# Altium PCB Audio_Meter_V4.5.PcbDoc (part 3 of 5)
Units mil, origin at the board's own origin, x right, y up, seen from the top; angles counter-clockwise.
Board outline 2756.14 x 2519.69 mil, 2 copper layers (Top Layer, Bottom Layer), stack 57.087 mil thick; 109 components, 62 nets, 315 pads, 566 vias.
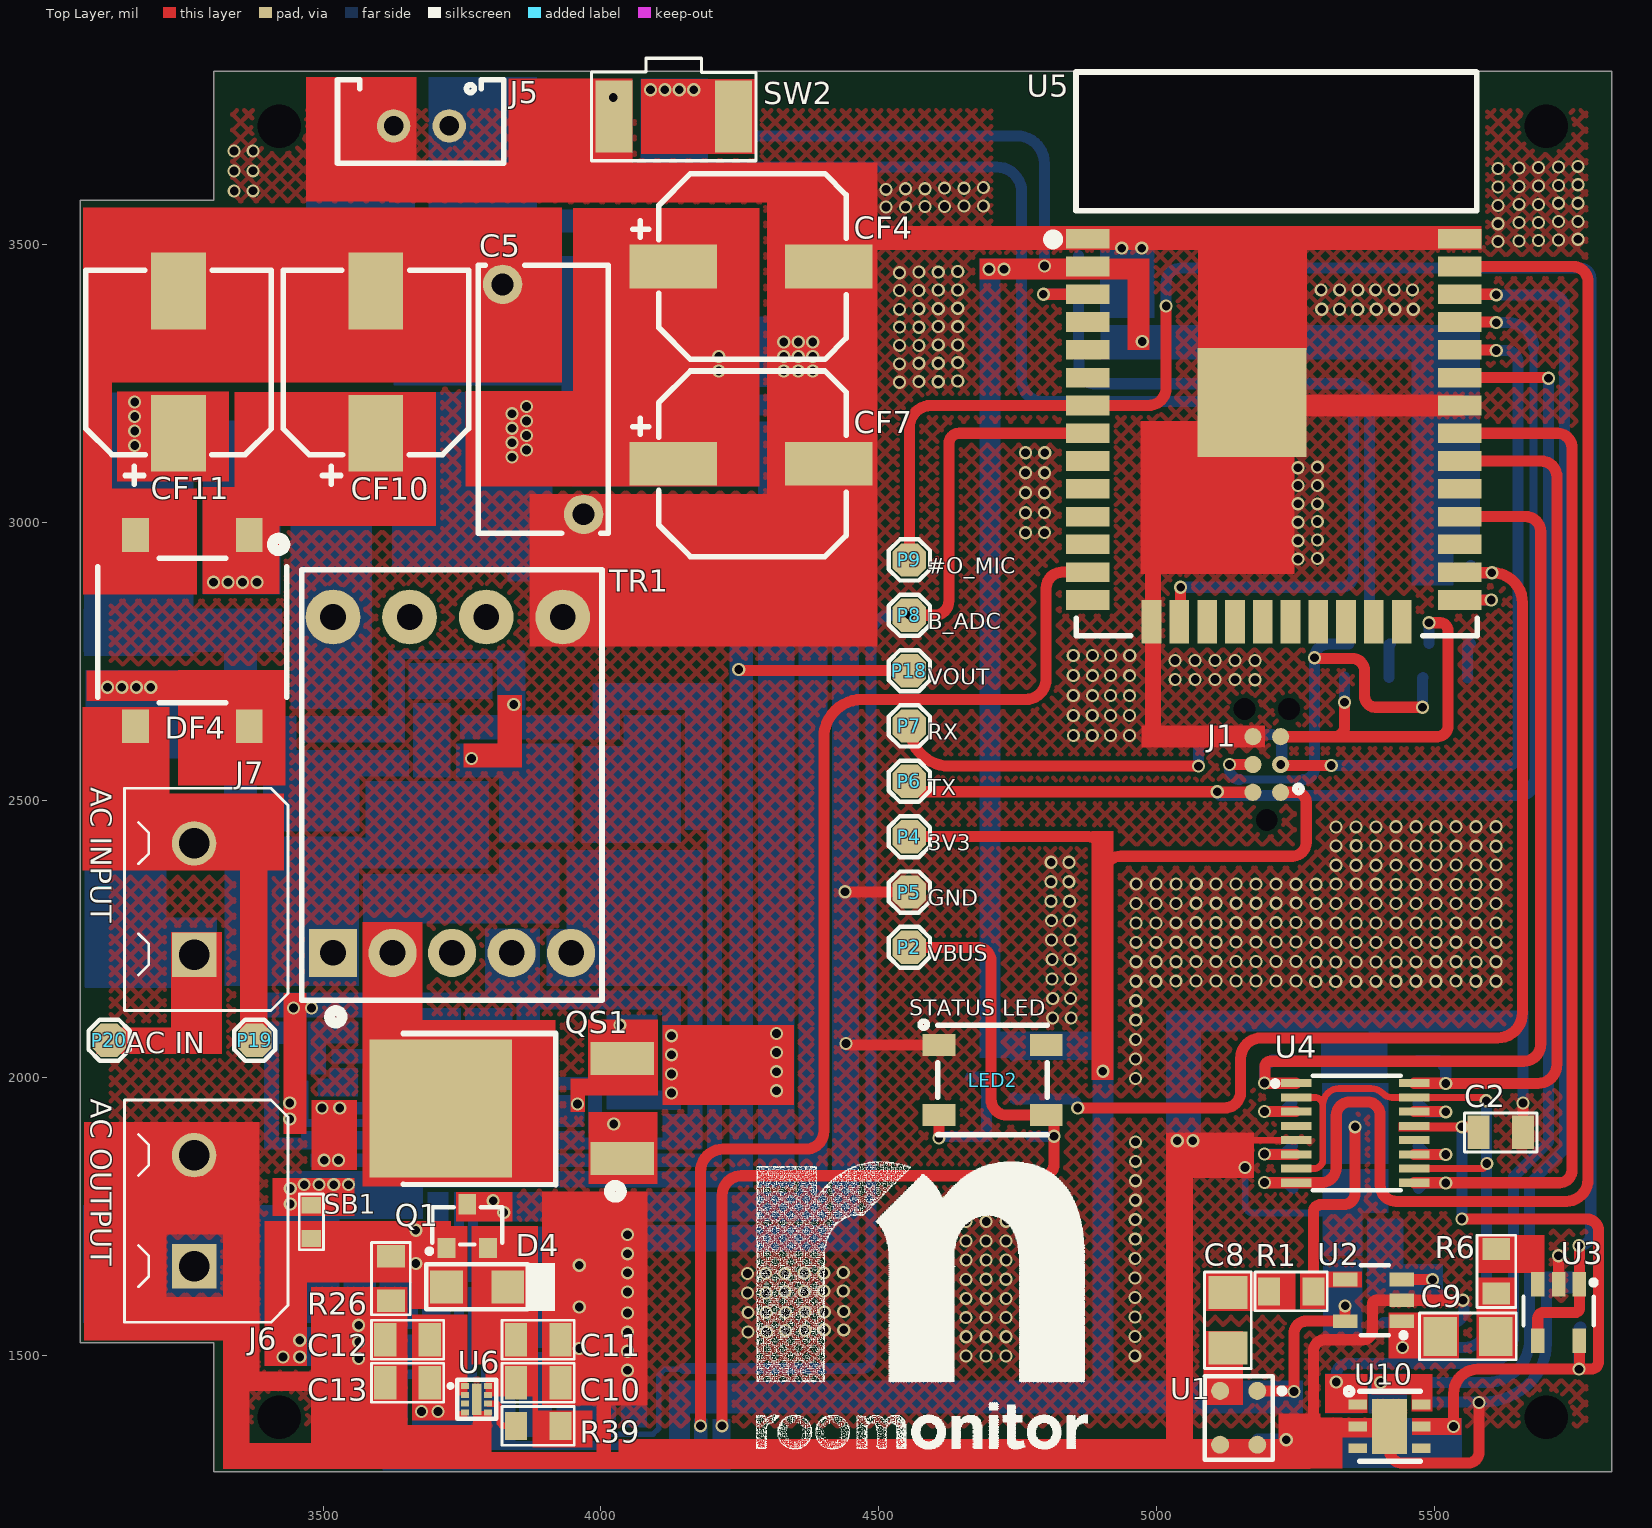
[diagram p0: Top Layer view]

## Part data (continued)
R26: library part ERJ-P06J104V, "RES SMD 100K OHM 5% 1/2W 0805", Case/Package=0805, Case Code (Metric)=2012, MANUFACTURER=Panasonic, Max Operating Temperature=155°C, Max Power Dissipation=250mW, Min Operating Temperature=-55°C, Package Quantity=5000, Power Rating=500mW, Resistance=100kR, Supplier Part Number 1=P100KADCT-ND, Temperature Coefficient=200ppm/°C, Tolerance=5%, Voltage Rating=400V, Voltage Rating (DC)=150V, Case Code (Imperial)=0805, ComponentLink1Description=https://www.verical.com/server-webapp/html/getDatasheet?partID=409513, ComponentLink1URL=https://www.verical.com/server-webapp/html/getDatasheet?partID=409513, ComponentLink2Description=http://components.arrow.com/part/dataview/44988207S7163511N1174, ComponentLink2URL=http://components.arrow.com/part/dataview/44988207S7163511N1174, ComponentLink3Description=https://www.seielect.com/Catalog/SEI-RMCF_RMCP.pdf, ComponentLink3URL=https://www.seielect.com/Catalog/SEI-RMCF_RMCP.pdf, ComponentLink4Description=http://www.seielect.com/catalog/sei-rmc.pdf, ComponentLink4URL=http://www.seielect.com/catalog/sei-rmc.pdf, ComponentLink5Description=https://datasheet.ciiva.com/7777/424479-7777391.pdf, ComponentLink5URL=https://datasheet.ciiva.com/7777/424479-7777391.pdf, ComponentLink6Description=https://datasheet.ciiva.com/2581/crcwhpe3-2581488.pdf, ComponentLink6URL=https://datasheet.ciiva.com/2581/crcwhpe3-2581488.pdf, ComponentLink7Description=https://datasheet.ciiva.com/11808/0900766b80d98b26-11808546.pdf, ComponentLink7URL=https://datasheet.ciiva.com/11808/0900766b80d98b26-11808546.pdf, ComponentLink8Description=https://datasheet.ciiva.com/8934/dcrcwe3-8934585.pdf, ComponentLink8URL=https://datasheet.ciiva.com/8934/dcrcwe3-8934585.pdf, ComponentLink9Description=https://datasheet.ciiva.com/2467/dcrcwe3-2467241.pdf, ComponentLink9URL=https://datasheet.ciiva.com/2467/dcrcwe3-2467241.pdf, ComponentLink10Description=https://datasheet.ciiva.com/7777/1697337-7777401.pdf, ComponentLink10URL=https://datasheet.ciiva.com/7777/1697337-7777401.pdf, ComponentLink11Description=https://datasheet.ciiva.com/16852/dcrcwe3-16852347.pdf, ComponentLink11URL=https://datasheet.ciiva.com/16852/dcrcwe3-16852347.pdf, ComponentLink12Description=https://datasheet.ciiva.com/16200/dcrcwe3-16200123.pdf, ComponentLink12URL=https://datasheet.ciiva.com/16200/dcrcwe3-16200123.pdf, ComponentLink13Description=https://datasheet.ciiva.com/16725/70201119-16725227.pdf, ComponentLink13URL=https://datasheet.ciiva.com/16725/70201119-16725227.pdf, ComponentLink14Description=https://datasheet.ciiva.com/2467/dcrcwe3-2467239.pdf, ComponentLink14URL=https://datasheet.ciiva.com/2467/dcrcwe3-2467239.pdf, ComponentLink15Description=https://datasheet.ciiva.com/7777/1720486-7777575.pdf, ComponentLink15URL=https://datasheet.ciiva.com/7777/1720486-7777575.pdf, ComponentLink16Description=https://datasheet.ciiva.com/8934/dcrcwe3-8934581.pdf, ComponentLink16URL=https://datasheet.ciiva.com/8934/dcrcwe3-8934581.pdf, ComponentLink17Description=https://datasheet.ciiva.com/2467/dcrcwe3-2467240.pdf, ComponentLink17URL=https://datasheet.ciiva.com/2467/dcrcwe3-2467240.pdf, ComponentLink18Description=https://datasheet.ciiva.com/7777/1720486-7777576.pdf, ComponentLink18URL=https://datasheet.ciiva.com/7777/1720486-7777576.pdf, ComponentLink19Description=https://datasheet.ciiva.com/5546/dcrcwe3-109170-5546983.pdf, ComponentLink19URL=https://datasheet.ciiva.com/5546/dcrcwe3-109170-5546983.pdf, ComponentLink20Description=https://datasheet.ciiva.com/16755/70201119-16755757.pdf, ComponentLink20URL=https://datasheet.ciiva.com/16755/70201119-16755757.pdf, ComponentLink21Description=https://datasheet.ciiva.com/3258/dcrcwe3-3258221.pdf, ComponentLink21URL=https://datasheet.ciiva.com/3258/dcrcwe3-3258221.pdf, ComponentLink22Description=https://datasheet.ciiva.com/17204/dcrcwe3-17204398.pdf, ComponentLink22URL=https://datasheet.ciiva.com/17204/dcrcwe3-17204398.pdf, ComponentLink23Description=https://datasheet.ciiva.com/16435/dcrcwe3-16435934.pdf, ComponentLink23URL=https://datasheet.ciiva.com/16435/dcrcwe3-16435934.pdf, ComponentLink24Description=https://datasheet.ciiva.com/46441/1533075-46441628.pdf, ComponentLink24URL=https://datasheet.ciiva.com/46441/1533075-46441628.pdf, ComponentLink25Description=https://datasheet.ciiva.com/5544/dcrcwe3-109170-5544649.pdf, ComponentLink25URL=https://datasheet.ciiva.com/5544/dcrcwe3-109170-5544649.pdf, ComponentLink26Description=https://datasheet.ciiva.com/8337/dcrcwe3-8337669.pdf, ComponentLink26URL=https://datasheet.ciiva.com/8337/dcrcwe3-8337669.pdf, ComponentLink27Description=https://datasheet.ciiva.com/2463/dcrcwe3-2463179.pdf, ComponentLink27URL=https://datasheet.ciiva.com/2463/dcrcwe3-2463179.pdf, ComponentLink28Description=https://datasheet.ciiva.com/2463/dcrcwe3-2463178.pdf, ComponentLink28URL=https://datasheet.ciiva.com/2463/dcrcwe3-2463178.pdf, ComponentLink29Description=https://datasheet.ciiva.com/2474/crcwhpe3-2474640.pdf, ComponentLink29URL=https://datasheet.ciiva.com/2474/crcwhpe3-2474640.pdf, ComponentLink30Description=https://datasheet.ciiva.com/48527/crcwhpe3-48527638.pdf, ComponentLink30URL=https://datasheet.ciiva.com/48527/crcwhpe3-48527638.pdf, ComponentLink31Description=https://datasheet.ciiva.com/5547/crcwhpe3-46056-5547896.pdf, ComponentLink31URL=https://datasheet.ciiva.com/5547/crcwhpe3-46056-5547896.pdf, ComponentLink32Description=https://datasheet.ciiva.com/9112/crcwhpe3-9112140.pdf, ComponentLink32URL=https://datasheet.ciiva.com/9112/crcwhpe3-9112140.pdf, ComponentLink33Description=https://datasheet.ciiva.com/2474/crcwhpe3-2474638.pdf, ComponentLink33URL=https://datasheet.ciiva.com/2474/crcwhpe3-2474638.pdf, ComponentLink34Description=https://datasheet.ciiva.com/2474/crcwhpe3-2474639.pdf, ComponentLink34URL=https://datasheet.ciiva.com/2474/crcwhpe3-2474639.pdf, ComponentLink35Description=http://uk.rs-online.com/webdocs/12cb/0900766b812cb812.pdf?src-supplier=RSComponents, ComponentLink35URL=http://uk.rs-online.com/webdocs/12cb/0900766b812cb812.pdf?src-supplier=RSComponents, ComponentLink36Description=http://industrial.panasonic.com/www-data/pdf/AOA0000/AOA0000CE4.pdf?src-supplier=Avnet, ComponentLink36URL=http://industrial.panasonic.com/www-data/pdf/AOA0000/AOA0000CE4.pdf?src-supplier=Avnet, ComponentLink37Description=http://industrial.panasonic.com/www-data/pdf/AOA0000/AOA0000CE4.pdf?src-supplier=Future+Electronics, ComponentLink37URL=http://industrial.panasonic.com/www-data/pdf/AOA0000/AOA0000CE4.pdf?src-supplier=Future+Electronics, ComponentLink38Description=http://www.farnell.com/datasheets/2059624.pdf?src-supplier=Element14, ComponentLink38URL=http://www.farnell.com/datasheets/2059624.pdf?src-supplier=Element14, ComponentLink39Description=https://www.alliedelec.com/m/d/12e4be79354a6c30aae91f11e8182ea0.pdf?src-supplier=Allied+Electronics, ComponentLink39URL=https://www.alliedelec.com/m/d/12e4be79354a6c30aae91f11e8182ea0.pdf?src-supplier=Allied+Electronics, ComponentLink40Description=http://www.farnell.com/datasheets/2059624.pdf?src-supplier=Farnell, ComponentLink40URL=http://www.farnell.com/datasheets/2059624.pdf?src-supplier=Farnell, ComponentLink41Description=http://industrial.panasonic.com/cdbs/www-data/pdf/RDO0000/AOA0000C331.pdf?src-supplier=Newark, ComponentLink41URL=http://industrial.panasonic.com/cdbs/www-data/pdf/RDO0000/AOA0000C331.pdf?src-supplier=Newark, ComponentLink42Description=https://industrial.panasonic.com/ww/system/files/data/download/catalog/id_fixed-resistors_e_1.pdf?src-supplier=Allied+Electronics, ComponentLink42URL=https://industrial.panasonic.com/ww/system/files/data/download/catalog/id_fixed-resistors_e_1.pdf?src-supplier=Allied+Electronics, ComponentLink43Description=http://industrial.panasonic.com/www-data/pdf/AOA0000/AOA0000CE4.pdf?src-supplier=Avnet+Europe, ComponentLink43URL=http://industrial.panasonic.com/www-data/pdf/AOA0000/AOA0000CE4.pdf?src-supplier=Avnet+Europe, Composition="Thick Film", Contact Plating=Tin, Depth=1.25mm, Height=0.6mm, Lead Free="Lead Free", Length=2mm, Manufacturer Part Number=ERJ-P06J104V, Military Standard=Not, Mount="Surface Mount", Number of Terminations=2, Packaging="Tape and Reel", Pricing 1="1=0.11, 10=0.103, 100=0.0396, 1000=0.0174, 2500=0.0151 (USD)", Radiation Hardening=No, REACH SVHC="No SVHC", Stock 1=131043, Supplier 1=Digi-Key, Termination=SMD/SMT, Width=1.2mm
R28: library part RC0402FR-07665RL, "RES SMD 665 OHM 1% 1/16W 0402", Case/Package=0402, Case Code (Metric)=1005, MANUFACTURER=Yageo, Max Operating Temperature=155°C, Max Power Dissipation=63mW, Min Operating Temperature=-55°C, Power Rating=62.5mW, Resistor Type="Thick Film", Supplier Part Number 1=YAG3208CT-ND, Temperature Coefficient=100ppm/°C, Tolerance=1%, Voltage Rating=50V, Case Code (Imperial)=0402, ComponentLink1Description=http://www.yageo.com/documents/recent/PYu-RC0402_51_RoHS_L_6.pdf?src-supplier=Avnet+Europe, ComponentLink1URL=http://www.yageo.com/documents/recent/PYu-RC0402_51_RoHS_L_6.pdf?src-supplier=Avnet+Europe, Contact Plating=Tin,Matte, Depth=0.5mm, Features="Moisture Resistant", Height=0.016inch, Lead Free="Lead Free", Length=1mm, Manufacturer Part Number=RC0402FR-07665RL, Military Standard=Not, Number of Terminations=2, Packaging="Tape and Reel", Pricing 1="1=0.1, 10=0.015, 100=0.0062, 1000=0.00278, 2500=0.00242, 5000=0.002 (USD)", Resistance=665R, Stock 1=287830, Supplier 1=Digi-Key, Termination=SMD/SMT, Width=0.02inch
R32 R33: library part ERJ-P06J105V, "RES SMD 1M OHM 5% 1/2W 0805", Case/Package=0805, Case Code (Metric)=2012, MANUFACTURER=Panasonic, Max Operating Temperature=155°C, Max Power Dissipation=500mW, Min Operating Temperature=-55°C, Package Quantity=1, Supplier Part Number 1=P1.0MADCT-ND, Temperature Coefficient=200ppm/°C, Tolerance=5%, Voltage Rating=400V, Voltage Rating (DC)=150V, Case Code (Imperial)=0805, ComponentLink1Description=https://www.verical.com/server-webapp/html/getDatasheet?partID=409513, ComponentLink1URL=https://www.verical.com/server-webapp/html/getDatasheet?partID=409513, ComponentLink2Description=http://components.arrow.com/part/dataview/44988207S7163511N1174, ComponentLink2URL=http://components.arrow.com/part/dataview/44988207S7163511N1174, ComponentLink3Description=https://www.seielect.com/Catalog/SEI-RMCF_RMCP.pdf, ComponentLink3URL=https://www.seielect.com/Catalog/SEI-RMCF_RMCP.pdf, ComponentLink4Description=http://www.seielect.com/catalog/sei-rmc.pdf, ComponentLink4URL=http://www.seielect.com/catalog/sei-rmc.pdf, ComponentLink5Description=https://datasheet.ciiva.com/7777/424479-7777391.pdf, ComponentLink5URL=https://datasheet.ciiva.com/7777/424479-7777391.pdf, ComponentLink6Description=https://datasheet.ciiva.com/2581/crcwhpe3-2581488.pdf, ComponentLink6URL=https://datasheet.ciiva.com/2581/crcwhpe3-2581488.pdf, ComponentLink7Description=https://datasheet.ciiva.com/11808/0900766b80d98b26-11808546.pdf, ComponentLink7URL=https://datasheet.ciiva.com/11808/0900766b80d98b26-11808546.pdf, ComponentLink8Description=https://datasheet.ciiva.com/8934/dcrcwe3-8934585.pdf, ComponentLink8URL=https://datasheet.ciiva.com/8934/dcrcwe3-8934585.pdf, ComponentLink9Description=https://datasheet.ciiva.com/2467/dcrcwe3-2467241.pdf, ComponentLink9URL=https://datasheet.ciiva.com/2467/dcrcwe3-2467241.pdf, ComponentLink10Description=https://datasheet.ciiva.com/7777/1697337-7777401.pdf, ComponentLink10URL=https://datasheet.ciiva.com/7777/1697337-7777401.pdf, ComponentLink11Description=https://datasheet.ciiva.com/16852/dcrcwe3-16852347.pdf, ComponentLink11URL=https://datasheet.ciiva.com/16852/dcrcwe3-16852347.pdf, ComponentLink12Description=https://datasheet.ciiva.com/16200/dcrcwe3-16200123.pdf, ComponentLink12URL=https://datasheet.ciiva.com/16200/dcrcwe3-16200123.pdf, ComponentLink13Description=https://datasheet.ciiva.com/16725/70201119-16725227.pdf, ComponentLink13URL=https://datasheet.ciiva.com/16725/70201119-16725227.pdf, ComponentLink14Description=https://datasheet.ciiva.com/2467/dcrcwe3-2467239.pdf, ComponentLink14URL=https://datasheet.ciiva.com/2467/dcrcwe3-2467239.pdf, ComponentLink15Description=https://datasheet.ciiva.com/7777/1720486-7777575.pdf, ComponentLink15URL=https://datasheet.ciiva.com/7777/1720486-7777575.pdf, ComponentLink16Description=https://datasheet.ciiva.com/8934/dcrcwe3-8934581.pdf, ComponentLink16URL=https://datasheet.ciiva.com/8934/dcrcwe3-8934581.pdf, ComponentLink17Description=https://datasheet.ciiva.com/2467/dcrcwe3-2467240.pdf, ComponentLink17URL=https://datasheet.ciiva.com/2467/dcrcwe3-2467240.pdf, ComponentLink18Description=https://datasheet.ciiva.com/7777/1720486-7777576.pdf, ComponentLink18URL=https://datasheet.ciiva.com/7777/1720486-7777576.pdf, ComponentLink19Description=https://datasheet.ciiva.com/5546/dcrcwe3-109170-5546983.pdf, ComponentLink19URL=https://datasheet.ciiva.com/5546/dcrcwe3-109170-5546983.pdf, ComponentLink20Description=https://datasheet.ciiva.com/16755/70201119-16755757.pdf, ComponentLink20URL=https://datasheet.ciiva.com/16755/70201119-16755757.pdf, ComponentLink21Description=https://datasheet.ciiva.com/3258/dcrcwe3-3258221.pdf, ComponentLink21URL=https://datasheet.ciiva.com/3258/dcrcwe3-3258221.pdf, ComponentLink22Description=https://datasheet.ciiva.com/17204/dcrcwe3-17204398.pdf, ComponentLink22URL=https://datasheet.ciiva.com/17204/dcrcwe3-17204398.pdf, ComponentLink23Description=https://datasheet.ciiva.com/16435/dcrcwe3-16435934.pdf, ComponentLink23URL=https://datasheet.ciiva.com/16435/dcrcwe3-16435934.pdf, ComponentLink24Description=https://datasheet.ciiva.com/46441/1533075-46441628.pdf, ComponentLink24URL=https://datasheet.ciiva.com/46441/1533075-46441628.pdf, ComponentLink25Description=https://datasheet.ciiva.com/5544/dcrcwe3-109170-5544649.pdf, ComponentLink25URL=https://datasheet.ciiva.com/5544/dcrcwe3-109170-5544649.pdf, ComponentLink26Description=https://datasheet.ciiva.com/8337/dcrcwe3-8337669.pdf, ComponentLink26URL=https://datasheet.ciiva.com/8337/dcrcwe3-8337669.pdf, ComponentLink27Description=https://datasheet.ciiva.com/2463/dcrcwe3-2463179.pdf, ComponentLink27URL=https://datasheet.ciiva.com/2463/dcrcwe3-2463179.pdf, ComponentLink28Description=https://datasheet.ciiva.com/2463/dcrcwe3-2463178.pdf, ComponentLink28URL=https://datasheet.ciiva.com/2463/dcrcwe3-2463178.pdf, ComponentLink29Description=https://datasheet.ciiva.com/2474/crcwhpe3-2474640.pdf, ComponentLink29URL=https://datasheet.ciiva.com/2474/crcwhpe3-2474640.pdf, ComponentLink30Description=https://datasheet.ciiva.com/48527/crcwhpe3-48527638.pdf, ComponentLink30URL=https://datasheet.ciiva.com/48527/crcwhpe3-48527638.pdf, ComponentLink31Description=https://datasheet.ciiva.com/5547/crcwhpe3-46056-5547896.pdf, ComponentLink31URL=https://datasheet.ciiva.com/5547/crcwhpe3-46056-5547896.pdf, ComponentLink32Description=https://datasheet.ciiva.com/9112/crcwhpe3-9112140.pdf, ComponentLink32URL=https://datasheet.ciiva.com/9112/crcwhpe3-9112140.pdf, ComponentLink33Description=https://datasheet.ciiva.com/2474/crcwhpe3-2474638.pdf, ComponentLink33URL=https://datasheet.ciiva.com/2474/crcwhpe3-2474638.pdf, ComponentLink34Description=https://datasheet.ciiva.com/2474/crcwhpe3-2474639.pdf, ComponentLink34URL=https://datasheet.ciiva.com/2474/crcwhpe3-2474639.pdf, ComponentLink35Description=http://uk.rs-online.com/webdocs/12cb/0900766b812cb812.pdf?src-supplier=RSComponents, ComponentLink35URL=http://uk.rs-online.com/webdocs/12cb/0900766b812cb812.pdf?src-supplier=RSComponents, ComponentLink36Description=http://industrial.panasonic.com/www-data/pdf/AOA0000/AOA0000CE4.pdf?src-supplier=Avnet, ComponentLink36URL=http://industrial.panasonic.com/www-data/pdf/AOA0000/AOA0000CE4.pdf?src-supplier=Avnet, ComponentLink37Description=http://industrial.panasonic.com/www-data/pdf/AOA0000/AOA0000CE4.pdf?src-supplier=Future+Electronics, ComponentLink37URL=http://industrial.panasonic.com/www-data/pdf/AOA0000/AOA0000CE4.pdf?src-supplier=Future+Electronics, ComponentLink38Description=http://www.farnell.com/datasheets/2059624.pdf?src-supplier=Element14, ComponentLink38URL=http://www.farnell.com/datasheets/2059624.pdf?src-supplier=Element14, ComponentLink39Description=https://www.alliedelec.com/m/d/12e4be79354a6c30aae91f11e8182ea0.pdf?src-supplier=Allied+Electronics, ComponentLink39URL=https://www.alliedelec.com/m/d/12e4be79354a6c30aae91f11e8182ea0.pdf?src-supplier=Allied+Electronics, ComponentLink40Description=http://www.farnell.com/datasheets/2059624.pdf?src-supplier=Farnell, ComponentLink40URL=http://www.farnell.com/datasheets/2059624.pdf?src-supplier=Farnell, ComponentLink41Description=http://www.alliedelec.com/m/d/12e4be79354a6c30aae91f11e8182ea0.pdf?src-supplier=Allied+Electronics, ComponentLink41URL=http://www.alliedelec.com/m/d/12e4be79354a6c30aae91f11e8182ea0.pdf?src-supplier=Allied+Electronics, ComponentLink42Description=http://www.mouser.com/ds/2/315/AOA0000CE4-64075.pdf?src-supplier=Mouser, ComponentLink42URL=http://www.mouser.com/ds/2/315/AOA0000CE4-64075.pdf?src-supplier=Mouser, ComponentLink43Description=http://industrial.panasonic.com/www-data/pdf/AOA0000/AOA0000CE4.pdf?src-supplier=Avnet+Europe, ComponentLink43URL=http://industrial.panasonic.com/www-data/pdf/AOA0000/AOA0000CE4.pdf?src-supplier=Avnet+Europe, Composition="Thick Film", Contact Plating=Tin, Depth=1.25mm, Features="Automotive AEC-Q200", Height=0.6mm, Lead Free="Lead Free", Length=2mm, Manufacturer Part Number=ERJ-P06J105V, Military Standard=Not, Mount="Surface Mount", Number of Terminations=2, Packaging="Tape and Reel", Power Rating=500mW, Pricing 1="1=0.11, 10=0.103, 100=0.0396, 1000=0.0174, 2500=0.0151 (USD)", Radiation Hardening=No, REACH SVHC=Unknown, Resistance=1M, Stock 1=57880, Supplier 1=Digi-Key, Termination=SMD/SMT, Width=0.049inch
RC1: library part RC0402JR-0710KL, "RES SMD 10K OHM 5% 1/16W 0402", Case/Package=0402, Case Code (Metric)=1005, MANUFACTURER=Yageo, Max Operating Temperature=155°C, Max Power Dissipation=63mW, Min Operating Temperature=-55°C, Package Quantity=1, Power Rating=62.5mW, Resistance=10kR, Supplier Part Number 1=311-10KJRCT-ND, Temperature Coefficient=100ppm/°C, Tolerance=5%, Voltage Rating=50V, Case Code (Imperial)=0402, ComponentLink1Description=https://www.verical.com/server-webapp/html/getDatasheet?partID=89073&src-supplier=Verical, ComponentLink1URL=https://www.verical.com/server-webapp/html/getDatasheet?partID=89073&src-supplier=Verical, ComponentLink2Description=http://www.yageo.com/documents/recent/PYu-RC_Group_51_RoHS_L_10.pdf?src-supplier=Digi-Key, ComponentLink2URL=http://www.yageo.com/documents/recent/PYu-RC_Group_51_RoHS_L_10.pdf?src-supplier=Digi-Key, ComponentLink3Description=http://www.mouser.com/ds/2/447/PYu-RC0402_51_RoHS_L_6_r-8721.pdf?src-supplier=Mouser, ComponentLink3URL=http://www.mouser.com/ds/2/447/PYu-RC0402_51_RoHS_L_6_r-8721.pdf?src-supplier=Mouser, ComponentLink4Description=http://www.farnell.com/datasheets/2167052.pdf?src-supplier=Element14, ComponentLink4URL=http://www.farnell.com/datasheets/2167052.pdf?src-supplier=Element14, Composition="Thick Film", Depth=0.5mm, Features="Moisture Resistant", Height=0.016inch, Lead Free="Lead Free", Length=1mm, Manufacturer Part Number=RC0402JR-0710KL, Military Standard=Not, Number of Terminations=2, Packaging="Tape and Reel", Pricing 1="1=0.1, 10=0.013, 100=0.0053, 1000=0.0024, 2500=0.0021, 5000=0.0017 (USD)", REACH SVHC=Unknown, Stock 1=6219642, Supplier 1=Digi-Key, Termination=SMD/SMT, Width=0.02inch
RF2 RF6 RF7: library part RK73H2ATTD5114F, "RES 5.11M OHM 1% 1/4W 0805", Case/Package=0805, Case Code (Metric)=2012, MANUFACTURER="KOA Speer", Max Operating Temperature=155°C, Min Operating Temperature=-55°C, Package Quantity=5000, Power Rating=125mW, Resistance=5.11MR, Supplier Part Number 1=2019-RK73H2ATTD5114FCT-ND, Temperature Coefficient=400ppm/°C, Tolerance=1%, Voltage Rating=150V, Case Code (Imperial)=0805, Category="Chip SMD Resistors", ComponentLink1Description=http://components.arrow.com/part/dataview/39731086S7548087N5146?src-supplier=Arrow+Electronics, ComponentLink1URL=http://components.arrow.com/part/dataview/39731086S7548087N5146?src-supplier=Arrow+Electronics, ComponentLink2Description=http://www.koaspeer.com/catimages/Products/RK73H/RK73H.pdf?src-supplier=Mouser, ComponentLink2URL=http://www.koaspeer.com/catimages/Products/RK73H/RK73H.pdf?src-supplier=Mouser, Height=0.5mm, Lead Free="Lead Free", Length=2mm, Manufacturer Part Number=RK73H2ATTD5114F, Packaging="Tape and Reel", Pricing 1="1=0.10000, 10=0.03000, 100=0.01240, 1000=0.00557, 2500=0.00483 (USD)", RoHS=Yes, Stock 1=19860, Supplier 1=Digi-Key, Termination=SMD/SMT, Voltage Rating (DC)=150V, Width=1.25mm
RF8: library part RK73H1ETTP4870F, "RES 487 OHM 1% 1/10W 0402", Case Code (Imperial)=0402, Case Code (Metric)=1005, MANUFACTURER="KOA Speer", Max Operating Temperature=155°C, Min Operating Temperature=-55°C, Package Quantity=10000, Power Rating=63mW, Resistor Type="Thick Film", Supplier Part Number 1=2019-RK73H1ETTP4870FCT-ND, Temperature Coefficient=100ppm/°C, Tolerance=1%, Voltage Rating=50V, Case/Package=0402, Category="Chip SMD Resistors", ComponentLink1Description=https://datasheet.ciiva.com/5554/rk73h-5554092.pdf?src-supplier=Mouser, ComponentLink1URL=https://datasheet.ciiva.com/5554/rk73h-5554092.pdf?src-supplier=Mouser, Depth=0.5mm, Height=0.35mm, Lead Free="Lead Free", Length=1mm, Manufacturer Part Number=RK73H1ETTP4870F, Military Standard=Not, Packaging="Tape and Reel", Pricing 1="1=0.10000, 10=0.02200, 100=0.00890, 1000=0.00398, 2500=0.00345, 5000=0.00285 (USD)", Resistance=487R, RoHS=Yes, Stock 1=19738, Supplier 1=Digi-Key, Termination=SMD/SMT, Voltage Rating (DC)=50V, Width=0.5mm
RF10: library part RK73B1ETTP100J, "RES 10 OHM 5% 1/10W 0402", Case/Package=0402, Case Code (Metric)=1005, MANUFACTURER="KOA Speer", Max Operating Temperature=155°C, Min Operating Temperature=-55°C, Package Quantity=10000, Power Rating=63mW, Resistor Type="Thick Film", Supplier Part Number 1=2019-RK73B1ETTP100JCT-ND, Temperature Coefficient=200ppm/°C, Tolerance=5%, Voltage Rating=50V, Case Code (Imperial)=0402, Category="Chip SMD Resistors", ComponentLink1Description=https://datasheet.ciiva.com/27054/1876725-27054392.pdf?src-supplier=Jameco, ComponentLink1URL=https://datasheet.ciiva.com/27054/1876725-27054392.pdf?src-supplier=Jameco, ComponentLink2Description=https://datasheet.ciiva.com/5554/rk73b-5554335.pdf?src-supplier=Mouser, ComponentLink2URL=https://datasheet.ciiva.com/5554/rk73b-5554335.pdf?src-supplier=Mouser, Depth=0.5mm, Height=0.35mm, Lead Free="Lead Free", Length=1mm, Manufacturer Part Number=RK73B1ETTP100J, Military Standard=Not, Mount="Surface Mount", Packaging="Tape and Reel", Pricing 1="1=0.10000, 10=0.01500, 100=0.00590, 1000=0.00265, 2500=0.00230, 5000=0.00190 (USD)", Resistance=10R, RoHS=Yes, Stock 1=424333, Supplier 1=Digi-Key, Termination=SMD/SMT, Voltage Rating (DC)=50V, Width=0.5mm
RF11 RF17: library part ERJ-2RKF1002X, "RES SMD 10K OHM 1% 1/10W 0402", Case/Package=0402, Case Code (Metric)=1005, MANUFACTURER=Panasonic, Max Operating Temperature=155°C, Max Power Dissipation=100mW, Min Operating Temperature=-55°C, Package Quantity=1, Resistance=10kR, Resistor Type="Thick Film", Supplier Part Number 1=P10.0KLCT-ND, Temperature Coefficient=100ppm/°C, Tolerance=1%, Voltage Rating=50V, Case Code (Imperial)=0402, Category="Chip SMD Resistors", ComponentLink1Description=https://datasheet.ciiva.com/11821/0900766b80f80784-11821171.pdf?src-supplier=RSComponents, ComponentLink1URL=https://datasheet.ciiva.com/11821/0900766b80f80784-11821171.pdf?src-supplier=RSComponents, ComponentLink2Description=https://datasheet.ciiva.com/16199/aoa0000ce2-16199478.pdf?src-supplier=Future+Electronics, ComponentLink2URL=https://datasheet.ciiva.com/16199/aoa0000ce2-16199478.pdf?src-supplier=Future+Electronics, ComponentLink3Description=https://datasheet.ciiva.com/17212/aoa0000ce2-17212102.pdf?src-supplier=Avnet+Europe, ComponentLink3URL=https://datasheet.ciiva.com/17212/aoa0000ce2-17212102.pdf?src-supplier=Avnet+Europe, ComponentLink4Description=https://datasheet.ciiva.com/24023/aoa0000ce2-24023017.pdf?src-supplier=Mouser, ComponentLink4URL=https://datasheet.ciiva.com/24023/aoa0000ce2-24023017.pdf?src-supplier=Mouser, ComponentLink5Description=https://datasheet.ciiva.com/28514/1678782-28514185.pdf?src-supplier=Element14, ComponentLink5URL=https://datasheet.ciiva.com/28514/1678782-28514185.pdf?src-supplier=Element14, ComponentLink6Description=https://datasheet.ciiva.com/43467/1678782-43467402.pdf?src-supplier=Farnell, ComponentLink6URL=https://datasheet.ciiva.com/43467/1678782-43467402.pdf?src-supplier=Farnell, ComponentLink7Description=https://datasheet.ciiva.com/27055/1987020-27055643.pdf?src-supplier=Jameco, ComponentLink7URL=https://datasheet.ciiva.com/27055/1987020-27055643.pdf?src-supplier=Jameco, ComponentLink8Description=https://datasheet.ciiva.com/48531/aoa0000ce2-48531069.pdf?src-supplier=Avnet, ComponentLink8URL=https://datasheet.ciiva.com/48531/aoa0000ce2-48531069.pdf?src-supplier=Avnet, ComponentLink9Description=https://datasheet.ciiva.com/9194/aoa0000ce2-9194142.pdf?src-supplier=Avnet, ComponentLink9URL=https://datasheet.ciiva.com/9194/aoa0000ce2-9194142.pdf?src-supplier=Avnet, ComponentLink10Description=https://datasheet.ciiva.com/16782/70260748-16782590.pdf?src-supplier=Allied+Electronics, ComponentLink10URL=https://datasheet.ciiva.com/16782/70260748-16782590.pdf?src-supplier=Allied+Electronics, ComponentLink11Description=https://datasheet.ciiva.com/16786/70260748-16786734.pdf?src-supplier=Allied+Electronics, ComponentLink11URL=https://datasheet.ciiva.com/16786/70260748-16786734.pdf?src-supplier=Allied+Electronics, ComponentLink12Description=https://datasheet.ciiva.com/30201/aoa0000ce2-30201022.pdf?src-supplier=Onlinecomponents.com, ComponentLink12URL=https://datasheet.ciiva.com/30201/aoa0000ce2-30201022.pdf?src-supplier=Onlinecomponents.com, Contact Plating=Tin, Depth=0.5mm, Features="Automotive AEC-Q200", Height=0.35mm, Lead Free="Lead Free", Length=1mm, Manufacturer Part Number=ERJ-2RKF1002X, Military Standard=Not, Mount="Surface Mount", Number of Pins=2, Number of Terminations=2, Packaging="Tape and Reel", Power Rating=100mW, Pricing 1="1=0.10000, 10=0.02200, 100=0.00890, 1000=0.00398, 2500=0.00345, 5000=0.00285 (USD)", Radiation Hardening=No, REACH SVHC="No SVHC", RoHS=Yes, Stock 1=15656546, Supplier 1=Digi-Key, Termination=SMD/SMT, Voltage Rating (DC)=50V, Width=0.02inch
RF12: library part 352210RJT, "RES SMD 10 OHM 5% 3W 2512", Case/Package=2512, Case Code (Metric)=6432, MANUFACTURER="TE Connectivity CGS", Manufacturer Part Number=1-2176230-4, Max Operating Temperature=105°C, Min Operating Temperature=-55°C, Number of Resistors=1, Power Rating=3W, Resistor Type="Thick Film,Power resistor", Supplier Part Number 1=A121124CT-ND, Temperature Coefficient=200ppm/°C, Tolerance=5%, Voltage Rating=250V, Case Code (Imperial)=2512, Category="Chip SMD Resistors", ComponentLink1Description=http://uk.rs-online.com/webdocs/142d/0900766b8142d0f1.pdf?src-supplier=RSComponents, ComponentLink1URL=http://uk.rs-online.com/webdocs/142d/0900766b8142d0f1.pdf?src-supplier=RSComponents, ComponentLink2Description=http://www.farnell.com/datasheets/2007092.pdf?src-supplier=Farnell, ComponentLink2URL=http://www.farnell.com/datasheets/2007092.pdf?src-supplier=Farnell, ComponentLink3Description=http://www.farnell.com/datasheets/2007092.pdf?src-supplier=Element14, ComponentLink3URL=http://www.farnell.com/datasheets/2007092.pdf?src-supplier=Element14, ComponentLink4Description=https://www.te.com/commerce/DocumentDelivery/DDEController?Action=srchrtrv&DocNm=9-1773463-7&DocType=DS&DocLang=English&src-supplier=Digi-Key, ComponentLink4URL=https://www.te.com/commerce/DocumentDelivery/DDEController?Action=srchrtrv&DocNm=9-1773463-7&DocType=DS&DocLang=English&src-supplier=Digi-Key, ComponentLink5Description=http://www.te.com/commerce/DocumentDelivery/DDEController?Action=srchrtrv&DocNm=9-1773463-7&DocType=DS&DocLang=English&src-supplier=Digi-Key, ComponentLink5URL=http://www.te.com/commerce/DocumentDelivery/DDEController?Action=srchrtrv&DocNm=9-1773463-7&DocType=DS&DocLang=English&src-supplier=Digi-Key, ComponentLink6Description=http://www.farnell.com/datasheets/2007092.pdf?src-supplier=Newark, ComponentLink6URL=http://www.farnell.com/datasheets/2007092.pdf?src-supplier=Newark, Depth=3.2mm, Height=1.1mm, Length=6.35mm, Mount="Surface Mount", Number of Terminations=2, Packaging="Tape and Reel", Pricing 1="1=0.56000, 10=0.46900, 100=0.31470, 1000=0.18411 (USD)", REACH SVHC=Unknown, Resistance=10R, RoHS=No, Stock 1=8393, Supplier 1=Digi-Key, Termination=Solder, Voltage Rating (DC)=250V
RF13: library part ERJ-1GNF4641C, "RES SMD 4.64K OHM 1% 1/20W 0201", Case/Package=0201, Case Code (Metric)=0603, MANUFACTURER=Panasonic, Manufacturer Part Number=ERJ-1GEF4641C, Max Operating Temperature=125°C, Max Power Dissipation=50mW, Min Operating Temperature=-55°C, Package Quantity=1, Resistance=4.64kR, Resistor Type="Thick Film", Supplier Part Number 1=667-ERJ-1GEF4641C, Temperature Coefficient=200ppm/°C, Tolerance=1%, Voltage Rating=25V, Voltage Rating (DC)=15V, Case Code (Imperial)=0201, Category="Chip SMD Resistors", ComponentLink1Description=https://datasheet.ciiva.com/2440/erj-g-r-e-rev08-2440120.pdf?src-supplier=Digi-Key, ComponentLink1URL=https://datasheet.ciiva.com/2440/erj-g-r-e-rev08-2440120.pdf?src-supplier=Digi-Key, ComponentLink2Description=https://datasheet.ciiva.com/2440/erj-g-r-e-rev08-2440121.pdf?src-supplier=Digi-Key, ComponentLink2URL=https://datasheet.ciiva.com/2440/erj-g-r-e-rev08-2440121.pdf?src-supplier=Digi-Key, ComponentLink3Description=https://datasheet.ciiva.com/2440/erj-g-r-e-rev08-2440122.pdf?src-supplier=Digi-Key, ComponentLink3URL=https://datasheet.ciiva.com/2440/erj-g-r-e-rev08-2440122.pdf?src-supplier=Digi-Key, ComponentLink4Description=https://datasheet.ciiva.com/30176/aoa0000ce2-30176906.pdf?src-supplier=Onlinecomponents.com, ComponentLink4URL=https://datasheet.ciiva.com/30176/aoa0000ce2-30176906.pdf?src-supplier=Onlinecomponents.com, Contact Plating=Tin, Height=0.01inch, Lead Free="Lead Free", Length=0.024inch, Mount="Surface Mount", Number of Terminations=2, Packaging="Tape and Reel", Power Rating=50mW, Pricing 1="1=0.17000, 50=0.02600, 100=0.01500, 500=0.01200, 1000=0.00900, 5000=0.00700 (USD)", RoHS=Yes, Stock 1=40860, Supplier 1=Mouser, Width=0.3mm
RF14: library part RK73H1ETTP2R05F, "Res 2.05 Ohm 1% 1/10W 0402", Case/Package=0402, MANUFACTURER="KOA Speer", Power Rating=62.5mW, Supplier Part Number 1=2019-RK73H1ETTP2R05FCT-ND, Temperature Coefficient=100ppm/°C, Voltage Rating (DC)=50V, Category="Chip SMD Resistors", Length=1mm, Manufacturer Part Number=RK73H1ETTP2R05F, Pricing 1="1000=0.00421 (USD)", Resistance=2.05R, RoHS=No, Supplier 1=Digi-Key, Width=500um
RF15: library part ERJ-2RKF1213X, "RES SMD 121K OHM 1% 1/10W 0402", Case/Package=0402, Case Code (Metric)=1005, MANUFACTURER=Panasonic, Max Operating Temperature=155°C, Max Power Dissipation=100mW, Min Operating Temperature=-55°C, Package Quantity=1, Resistance=121kR, Resistor Type="Thick Film", Supplier Part Number 1=P121KLCT-ND, Temperature Coefficient=100ppm/°C, Tolerance=1%, Voltage Rating=50V, Case Code (Imperial)=0402, Category="Chip SMD Resistors", ComponentLink1Description=https://datasheet.ciiva.com/30175/aoa0000ce2-30175510.pdf?src-supplier=Onlinecomponents.com, ComponentLink1URL=https://datasheet.ciiva.com/30175/aoa0000ce2-30175510.pdf?src-supplier=Onlinecomponents.com, ComponentLink2Description=https://datasheet.ciiva.com/28531/1678782-28531400.pdf?src-supplier=Element14, ComponentLink2URL=https://datasheet.ciiva.com/28531/1678782-28531400.pdf?src-supplier=Element14, ComponentLink3Description=https://datasheet.ciiva.com/9186/aoa0000ce2-9186073.pdf?src-supplier=Avnet, ComponentLink3URL=https://datasheet.ciiva.com/9186/aoa0000ce2-9186073.pdf?src-supplier=Avnet, ComponentLink4Description=https://datasheet.ciiva.com/46441/426256-46441257.pdf?src-supplier=Element14, ComponentLink4URL=https://datasheet.ciiva.com/46441/426256-46441257.pdf?src-supplier=Element14, ComponentLink5Description=https://datasheet.ciiva.com/28683/1678782-28683147.pdf?src-supplier=Element14, ComponentLink5URL=https://datasheet.ciiva.com/28683/1678782-28683147.pdf?src-supplier=Element14, ComponentLink6Description=https://datasheet.ciiva.com/24069/aoa0000ce2-24069100.pdf?src-supplier=Mouser, ComponentLink6URL=https://datasheet.ciiva.com/24069/aoa0000ce2-24069100.pdf?src-supplier=Mouser, Contact Plating=Tin, Depth=0.5mm, Features="Automotive AEC-Q200", Height=0.016inch, Lead Free="Lead Free", Length=1mm, Manufacturer Part Number=ERJ-2RKF1213X, Military Standard=Not, Mount="Surface Mount", Number of Terminations=2, Packaging="Tape and Reel", Power Rating=100mW, Pricing 1="1=0.10000, 10=0.02200, 100=0.00890, 1000=0.00398, 2500=0.00345, 5000=0.00285 (USD)", REACH SVHC="No SVHC", RoHS=Yes, Stock 1=23579, Supplier 1=Digi-Key, Termination=SMD/SMT, Voltage Rating (DC)=50V, Width=0.02inch
RF16: library part RK73H1ETTP3012F, "RES 30.1K OHM 1% 1/10W 0402", Case/Package=0402, Case Code (Metric)=1005, MANUFACTURER="KOA Speer", Max Operating Temperature=155°C, Min Operating Temperature=-55°C, Package Quantity=10000, Power Rating=63mW, Resistance=30.1kR, Resistor Type="Thick Film", Supplier Part Number 1=2019-RK73H1ETTP3012FCT-ND, Temperature Coefficient=100ppm/°C, Tolerance=1%, Voltage Rating=50V, Case Code (Imperial)=0402, Category="Chip SMD Resistors", ComponentLink1Description=http://components.arrow.com/part/dataview/39721483S6492630N5146?src-supplier=Arrow+Electronics, ComponentLink1URL=http://components.arrow.com/part/dataview/39721483S6492630N5146?src-supplier=Arrow+Electronics, ComponentLink2Description=http://www.jameco.com/Jameco/Products/ProdDS/1883343.pdf?src-supplier=Jameco, ComponentLink2URL=http://www.jameco.com/Jameco/Products/ProdDS/1883343.pdf?src-supplier=Jameco, ComponentLink3Description=https://www.verical.com/server-webapp/html/getDatasheet?partID=170797&src-supplier=Verical, ComponentLink3URL=https://www.verical.com/server-webapp/html/getDatasheet?partID=170797&src-supplier=Verical, ComponentLink4Description=http://www.koaspeer.com/catimages/Products/RK73H/RK73H.pdf?src-supplier=Mouser, ComponentLink4URL=http://www.koaspeer.com/catimages/Products/RK73H/RK73H.pdf?src-supplier=Mouser, Depth=0.5mm, Height=0.35mm, Lead Free="Lead Free", Length=1mm, Manufacturer Part Number=RK73H1ETTP3012F, Military Standard=Not, Mount="Surface Mount", Packaging="Tape and Reel", Pricing 1="1=0.10000, 10=0.02200, 100=0.00890, 1000=0.00398, 2500=0.00345, 5000=0.00285 (USD)", RoHS=Yes, Stock 1=324728, Supplier 1=Digi-Key, Termination=SMD/SMT, Voltage Rating (DC)=50V, Width=0.5mm
RF18: library part ERJ-2RKF22R6X, "RES SMD 22.6 OHM 1% 1/10W 0402", Case/Package=0402, Case Code (Metric)=1005, MANUFACTURER=Panasonic, Max Operating Temperature=155°C, Max Power Dissipation=100mW, Min Operating Temperature=-55°C, Package Quantity=1, Resistor Type="Thick Film", Supplier Part Number 1=P22.6LCT-ND, Temperature Coefficient=100ppm/°C, Tolerance=1%, Voltage Rating=50V, Case Code (Imperial)=0402, Category="Chip SMD Resistors", ComponentLink1Description=https://datasheet.ciiva.com/43467/1678782-43467159.pdf?src-supplier=Farnell, ComponentLink1URL=https://datasheet.ciiva.com/43467/1678782-43467159.pdf?src-supplier=Farnell, ComponentLink2Description=https://datasheet.ciiva.com/22682/1678782-22682056.pdf?src-supplier=Element14, ComponentLink2URL=https://datasheet.ciiva.com/22682/1678782-22682056.pdf?src-supplier=Element14, ComponentLink3Description=https://datasheet.ciiva.com/30072/aoa0000ce2-30072009.pdf?src-supplier=Onlinecomponents.com, ComponentLink3URL=https://datasheet.ciiva.com/30072/aoa0000ce2-30072009.pdf?src-supplier=Onlinecomponents.com, ComponentLink4Description=https://datasheet.ciiva.com/24026/aoa0000ce2-24026219.pdf?src-supplier=Mouser, ComponentLink4URL=https://datasheet.ciiva.com/24026/aoa0000ce2-24026219.pdf?src-supplier=Mouser, ComponentLink5Description=https://datasheet.ciiva.com/22759/1678782-22759662.pdf?src-supplier=Farnell, ComponentLink5URL=https://datasheet.ciiva.com/22759/1678782-22759662.pdf?src-supplier=Farnell, ComponentLink6Description=https://datasheet.ciiva.com/46373/1678782-46373743.pdf?src-supplier=Element14, ComponentLink6URL=https://datasheet.ciiva.com/46373/1678782-46373743.pdf?src-supplier=Element14, Contact Plating=Tin, Depth=0.5mm, Features="Automotive AEC-Q200", Height=0.016inch, Length=1mm, Manufacturer Part Number=ERJ-2RKF22R6X, Military Standard=Not, Mount="Surface Mount", Number of Terminations=2, Packaging="Tape and Reel", Power Rating=100mW, Pricing 1="1=0.10000, 10=0.02200, 100=0.00890, 1000=0.00398, 2500=0.00345, 5000=0.00285 (USD)", Radiation Hardening=No, REACH SVHC="No SVHC", Resistance=22.6R, RoHS=Yes, Stock 1=139011, Supplier 1=Digi-Key, Termination=SMD/SMT, Voltage Rating (DC)=50V, Width=0.02inch
RF19: library part AC0201FR-073K01L, "RES SMD 3.01K OHM 1% 1/20W 0201", Case/Package=0201, MANUFACTURER=Yageo, Max Operating Temperature=155°C, Max Power Dissipation=50mW, Min Operating Temperature=-55°C, Resistance=3.01kR, Resistor Type="Thick Film", Supplier Part Number 1=YAG5205CT-ND, Temperature Coefficient=200ppm/°C, Tolerance=1%, Category="Chip SMD Resistors", ComponentLink1Description=http://www.yageo.com/NewPortal/yageodocoutput?fileName=/pdf/R-Chip/PYu-AC_51_RoHS_L_6.pdf&src-supplier=Digi-Key, ComponentLink1URL=http://www.yageo.com/NewPortal/yageodocoutput?fileName=/pdf/R-Chip/PYu-AC_51_RoHS_L_6.pdf&src-supplier=Digi-Key, ComponentLink2Description=http://www.yageo.com/NewPortal/yageodocoutput?fileName=/pdf/R-Chip/PYu-AC_51_RoHS_L_5.pdf&src-supplier=Digi-Key, ComponentLink2URL=http://www.yageo.com/NewPortal/yageodocoutput?fileName=/pdf/R-Chip/PYu-AC_51_RoHS_L_5.pdf&src-supplier=Digi-Key, Features="Moisture Resistant,Automotive AEC-Q200", Height=0.01inch, Length=0.024inch, Manufacturer Part Number=AC0201FR-073K01L, Number of Terminations=2, Packaging="Tape and Reel", Pricing 1="1=0.10000, 10=0.05800, 100=0.02350, 1000=0.01055, 2500=0.00916, 5000=0.00756 (USD)", RoHS=Yes, Stock 1=39278, Supplier 1=Digi-Key, Width=0.012inch
SB1 SBxx: "Solder Bridge ON"
SW2: library part KSS221GLFS, "Tactile Switch SPST-NO Side Actuated Surface Mount, Right Angle", Contact Current Rating=50mA, Contact Resistance=100mR, Insulation Resistance=1GR, IP Rating=IP40, MANUFACTURER="ITT C&K", Max Operating Temperature=85°C, Max Voltage Rating (DC)=32V, Min Operating Temperature=-40°C, Operating Force=2N, Package Quantity=1, Power Rating=1W, Supplier Part Number 1=401-1097-6-ND, Actuator Length=0.8mm, ComponentLink1Description=https://datasheet.ciiva.com/26917/getdatasheetpartid-773364-26917575.pdf, ComponentLink1URL=https://datasheet.ciiva.com/26917/getdatasheetpartid-773364-26917575.pdf, ComponentLink2Description=https://datasheet.ciiva.com/30466/0900766b8129cd37-30466697.pdf, ComponentLink2URL=https://datasheet.ciiva.com/30466/0900766b8129cd37-30466697.pdf, ComponentLink3Description=https://datasheet.ciiva.com/16496/kss221g20lfs-16496166.pdf, ComponentLink3URL=https://datasheet.ciiva.com/16496/kss221g20lfs-16496166.pdf, ComponentLink4Description=https://datasheet.ciiva.com/18145/getdatasheetpartid-313005-18145235.pdf, ComponentLink4URL=https://datasheet.ciiva.com/18145/getdatasheetpartid-313005-18145235.pdf, ComponentLink5Description=https://datasheet.ciiva.com/16155/kss221glfs-ckcomponents-16155741.pdf, ComponentLink5URL=https://datasheet.ciiva.com/16155/kss221glfs-ckcomponents-16155741.pdf, ComponentLink6Description=https://datasheet.ciiva.com/5684/19445-5684460.pdf, ComponentLink6URL=https://datasheet.ciiva.com/5684/19445-5684460.pdf, ComponentLink7Description=https://datasheet.ciiva.com/2900/kss-2900345.pdf, ComponentLink7URL=https://datasheet.ciiva.com/2900/kss-2900345.pdf, ComponentLink8Description=https://datasheet.ciiva.com/2900/kss-2900343.pdf, ComponentLink8URL=https://datasheet.ciiva.com/2900/kss-2900343.pdf, ComponentLink9Description=https://datasheet.ciiva.com/7986/19445-7986997.pdf, ComponentLink9URL=https://datasheet.ciiva.com/7986/19445-7986997.pdf, ComponentLink10Description=https://datasheet.ciiva.com/2900/kss-2900344.pdf, ComponentLink10URL=https://datasheet.ciiva.com/2900/kss-2900344.pdf, Contact Material=Silver, Contact Plating=Silver, Current Rating=50mA, Depth=4.4mm, Illumination Type=Non-Illuminated,Illuminated, Lead Free="Lead Free", Length=4.5mm, Manufacturer Part Number=KSS221GLFS, Max Current Rating=50mA, Mechanical Life=100000Cycles, Mount="Surface Mount", Orientation="Right Angle", Packaging="Tape and Reel", Pricing 1="1=0.68, 10=0.655, 25=0.6424, 50=0.6182, 100=0.5334, 250=0.4849, 500=0.4607, 1000=0.3637 (USD)", Radiation Hardening=No, REACH SVHC="No SVHC", Stock 1=17242, Supplier 1=Digi-Key, Switch Function=Off-Mom, Switch Travel=0.3mm, Termination="Gull Wing", Throw Configuration=SPST, Voltage Rating (DC)=32V, Width=7mm
TR1: "FLYBACK XFRM WE-FB T-WIN", Current Rating=440mA, DC Resistance (DCR)=2.15R, Frequency=130kHz, Inductance=925uH, MANUFACTURER="Wurth Electronics Midcom", Max Operating Temperature=125°C, Min Operating Temperature=-40°C, Package Quantity=130, Supplier Part Number 1=1297-1022-ND, Category=Transformers, ComponentLink1Description=https://datasheet.ciiva.com/18573/750312723-18573722.pdf?src-supplier=Digi-Key, ComponentLink1URL=https://datasheet.ciiva.com/18573/750312723-18573722.pdf?src-supplier=Digi-Key, Height=10.2mm, Height - Seated (Max)=10.41mm, Length=20.45mm, Manufacturer Part Number=750312723, Mount="Through Hole", Packaging=Tray, Pricing 1="1=5.18000, 10=5.11100, 50=4.79100, 100=4.31200, 500=3.83300 (USD)", RoHS=Yes, Shielding=Shielded, Stock 1=109, Supplier 1=Digi-Key, Termination="Through Hole", Width=19.7mm
U1: "SPU-TOP MIC IOT FOCUSED MIC", MANUFACTURER=Knowles, Operating Supply Current=250uA, Operating Supply Voltage=3.6V, Package Quantity=1200, Supplier Part Number 1=423-1138-1-ND, ComponentLink1Description=https://media.digikey.com/pdf/Data%20Sheets/Knowles%20Acoustics%20PDFs/SiSonic_Design_Guide.pdf?src-supplier=Mouser, ComponentLink1URL=https://media.digikey.com/pdf/Data%20Sheets/Knowles%20Acoustics%20PDFs/SiSonic_Design_Guide.pdf?src-supplier=Mouser, ComponentLink2Description=https://media.digikey.com/pdf/Data%20Sheets/Knowles%20Acoustics%20PDFs/SiSonic_Design_Guide.pdf?src-supplier=Digi-Key, ComponentLink2URL=https://media.digikey.com/pdf/Data%20Sheets/Knowles%20Acoustics%20PDFs/SiSonic_Design_Guide.pdf?src-supplier=Digi-Key, Depth=1.2mm, Direction=Omnidirectional, Height=1.2mm, Impedance=300R, Length=3.76mm, Manufacturer Part Number=SPU0410HR5H-PB, Output Type=Analog, Packaging="Tape and Reel", Pricing 1="1=0.82, 10=0.688, 25=0.6376, 50=0.6006, 100=0.5649, 500=0.48696 (USD)", Shape=Rectangular, Signal to Noise Ratio (SNR)=59dB, Stock 1=83682, Supplier 1=Digi-Key, Termination=SMD/SMT, Voltage Rating=3.6V, Width=2.95mm
U2 U3: "IC OPAMP GP 1 CIRCUIT SOT23-5", Case/Package=SOT-23, Input Bias Current=10pA, Input Offset Voltage (Vos)=1mV, MANUFACTURER="Texas Instruments", Max Operating Temperature=85°C, Max Supply Voltage=5.5V, Min Operating Temperature=-40°C, Min Supply Voltage=2.7V, Nominal Supply Current=250uA, Output Current per Channel=15mA, Package Quantity=250, Power Supply Rejection Ratio (PSRR)=90.46dB, Quiescent Current=250mA, Supplier Part Number 1=OPA344NACT-ND, Voltage Gain=122dB, Bandwidth=1MHz, Common Mode Rejection Ratio=76dB, ComponentLink1Description=http://www.ti.com/general/docs/lit/getliterature.tsp?genericPartNumber=OPA344&fileType=pdf&src-supplier=Newark, ComponentLink1URL=http://www.ti.com/general/docs/lit/getliterature.tsp?genericPartNumber=OPA344&fileType=pdf&src-supplier=Newark, ComponentLink2Description=http://www.farnell.com/datasheets/1882856.pdf?src-supplier=Element14, ComponentLink2URL=http://www.farnell.com/datasheets/1882856.pdf?src-supplier=Element14, ComponentLink3Description=http://www.ti.com/lit/ds/symlink/opa344.pdf?src-supplier=Digi-Key, ComponentLink3URL=http://www.ti.com/lit/ds/symlink/opa344.pdf?src-supplier=Digi-Key, ComponentLink4Description=http://focus.ti.com/lit/ds/symlink/opa344.pdf?src-supplier=Avnet+Europe, ComponentLink4URL=http://focus.ti.com/lit/ds/symlink/opa344.pdf?src-supplier=Avnet+Europe, ComponentLink5Description=http://www.ti.com/general/docs/lit/getliterature.tsp?genericPartNumber=OPA4345&&fileType=pdf&src-supplier=Avnet, ComponentLink5URL=http://www.ti.com/general/docs/lit/getliterature.tsp?genericPartNumber=OPA4345&&fileType=pdf&src-supplier=Avnet, Gain Bandwidth Product=1MHz, Height=1.15mm, Lead Free="Lead Free", Length=2.9mm, Manufacturer Part Number=OPA344NA/250, Max I/O Voltage=1mV, Number of Amplifiers=1, Number of Channels=1, Number of Circuits=1, Number of Elements=1, Number of Pins=5, Packaging="Tape and Reel", Pricing 1="1=1.59, 10=1.43, 25=1.3492, 100=1.0794 (USD)", Radiation Hardening=No, REACH SVHC="No SVHC", Slew Rate=0.8V/µs, Stock 1=6132, Supplier 1=Digi-Key, Unity Gain Bandwidth Product=1MHz, Width=1.6mm
U4: "IC SWITCH QUAD SPST 16TSSOP", Case/Package=TSSOP, High Level Output Current=30mA, MANUFACTURER="Analog Devices", Max Operating Temperature=85°C, Max Power Dissipation=5uW, Max Supply Current=1uA, Max Supply Voltage=5.5V, Min Operating Temperature=-40°C, Min Supply Voltage=1.8V, On-State Resistance=4R, Operating Supply Current=1nA, Package Quantity=1, Power Dissipation=430mW, Supplier Part Number 1=ADG712BRUZ-REELCT-ND, -3db Bandwidth=200MHz, Bandwidth=200MHz, ComponentLink1Description=http://www.analog.com/media/en/technical-documentation/data-sheets/ADG711_712_713.pdf?src-supplier=Digi-Key, ComponentLink1URL=http://www.analog.com/media/en/technical-documentation/data-sheets/ADG711_712_713.pdf?src-supplier=Digi-Key, ComponentLink2Description=http://datasheet.iiic.cc/analog_devices/ADG712BRUZ-REEL.pdf?src-supplier=IIIC, ComponentLink2URL=http://datasheet.iiic.cc/analog_devices/ADG712BRUZ-REEL.pdf?src-supplier=IIIC, Contact Plating=Tin,Matte, Interface=Parallel, Lead Free="Contains Lead", Manufacturer Part Number=ADG712BRUZ-REEL, Mount="Surface Mount", Number of Bits=4, Number of Channels=4, Number of Circuits=4, Number of Inputs=4, Number of Outputs=4, Number of Pins=16, Packaging="Tape and Reel", Polarity=Non-Inverting, Pricing 1="1=2.89, 10=2.598, 25=2.4564, 100=2.129, 250=2.01984, 500=1.81238, 1000=1.52852 (USD)", Stock 1=4085, Supplier 1=Digi-Key, Supply Type=Single, Throw Configuration=SPST, Turn-Off Delay Time=6ns, Turn-On Delay Time=11ns
U5: "WIFI MODULE 128MBITS SPI FLASH", Case/Package=SMD/SMT, Frequency=2.5GHz, MANUFACTURER="Espressif Systems", Manufacturer Part Number=ESP32-WROOM-32D(16MB), Max Operating Temperature=85°C, Min Operating Temperature=-40°C, Supplier Part Number 1=356-ES32WROOM32D16MB, ComponentLink1Description=https://www.espressif.com/sites/default/files/documentation/esp32-wroom-32d_esp32-wroom-32u_datasheet_en.pdf?src-supplier=Digi-Key, ComponentLink1URL=https://www.espressif.com/sites/default/files/documentation/esp32-wroom-32d_esp32-wroom-32u_datasheet_en.pdf?src-supplier=Digi-Key, Data Rate=150Mbps, Interface=I2C,SPI,GPIO,PWM,SDIO,UART, Memory Size=536KB, Mount="Surface Mount", Packaging="Tape and Reel", Pricing 1="1=4.5, 5=4.5 (USD)", Sensitivity=-98dBm, Stock 1=3620, Supplier 1=Mouser
U6: "IC REG LINEAR 3.3V 1A 8XDFN", Dropout Voltage=95mV, MANUFACTURER="ON Semiconductor", Max Operating Temperature=125°C, Min Current Limit=1.1A, Min Operating Temperature=-40°C, Output Current=1A, Output Voltage=3.3V, Supplier Part Number 1=NCP186AMX330TAGOSCT-ND, ComponentLink1Description=http://www.farnell.com/datasheets/2236905.pdf?src-supplier=Farnell, ComponentLink1URL=http://www.farnell.com/datasheets/2236905.pdf?src-supplier=Farnell, ComponentLink2Description=http://www.farnell.com/datasheets/2236905.pdf?src-supplier=Newark, ComponentLink2URL=http://www.farnell.com/datasheets/2236905.pdf?src-supplier=Newark, ComponentLink3Description=http://www.onsemi.com/pub/Collateral/NCP186-D.PDF?src-supplier=Digi-Key, ComponentLink3URL=http://www.onsemi.com/pub/Collateral/NCP186-D.PDF?src-supplier=Digi-Key, ComponentLink4Description=https://www.onsemi.com/pub/Collateral/NCP186-D.PDF?src-supplier=Digi-Key, ComponentLink4URL=https://www.onsemi.com/pub/Collateral/NCP186-D.PDF?src-supplier=Digi-Key, Lead Free="Lead Free", Manufacturer Part Number=NCP186AMX330TAG, Mount="Surface Mount", Number of Pins=8, Number of Regulators=1, Packaging="Tape and Reel", Pricing 1="1=0.48, 10=0.39, 25=0.3564, 100=0.2405, 250=0.199, 500=0.18242, 1000=0.13682 (USD)", Stock 1=5995, Supplier 1=Digi-Key